# Altium PCB 24V-20A-Power-Board-v1.0.PcbDoc (part 4 of 4)
Units mil, origin at the board's own origin, x right, y up, seen from the top; angles counter-clockwise.
Board outline 6298 x 5166 mil, 4 copper layers (Top Layer, Layer-1, Layer-2, Bottom Layer), stack 61.653 mil thick; 190 components, 110 nets, 477 pads, 30 vias.
Unrouted connection lines stored in the file: 351.
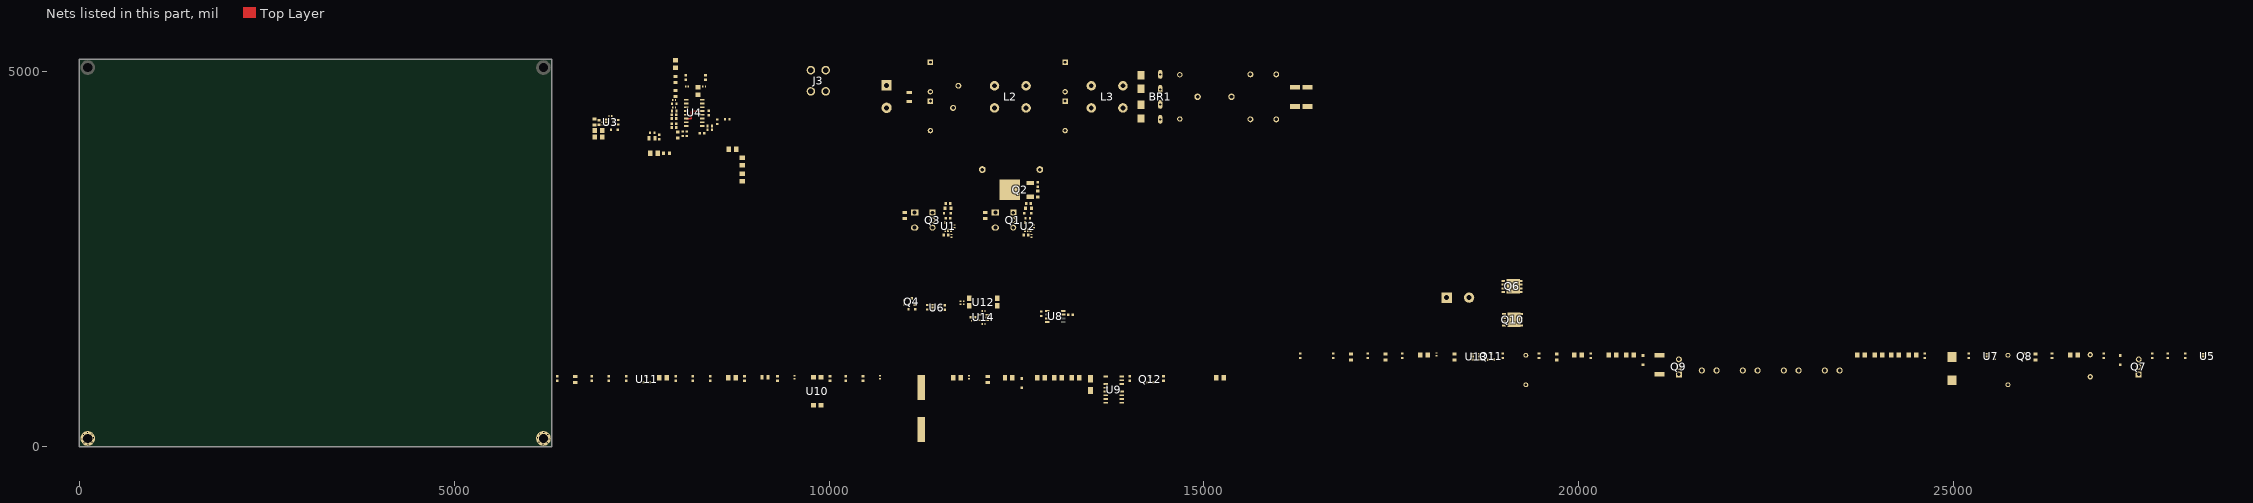
[diagram p2: the nets of this part, all layers, seen from the top]

## Part data (continued)
R40 R44 R75 R76: library part CRCW080510R0FKEAHP, "RES SMD 10 OHM 1% 1/2W 0805", Case Code (Imperial)=0805, Case Code (Metric)=2012, LCSC Part Number=C844598, Manufacturer=Vishay, Max Operating Temperature=155°C, Max Power Dissipation=333mW, Min Operating Temperature=-55°C, Package Quantity=5000, Power Rating=330mW, Ratings=AEC-Q200, Resistance Tolerance=1%, Resistor Type="Thick Film", Temperature Coefficient=100ppm/°C, Voltage Rating=150V, Case/Package=0805, ComponentLink1Description=http://www.farnell.com/datasheets/2884039.pdf?src-supplier=Newark, ComponentLink1URL=http://www.farnell.com/datasheets/2884039.pdf?src-supplier=Newark, ComponentLink2Description=https://datasheet.octopart.com/CRCW080510R0FKEAHP-Vishay-datasheet-87136057.pdf?src-supplier=Newark, ComponentLink2URL=https://datasheet.octopart.com/CRCW080510R0FKEAHP-Vishay-datasheet-87136057.pdf?src-supplier=Newark, ComponentLink3Description=http://www.vishay.com/docs/20043/crcwhpe3.pdf?src-supplier=Digikey, ComponentLink3URL=http://www.vishay.com/docs/20043/crcwhpe3.pdf?src-supplier=Digikey, Construction=Rectangular, Contact Plating=Tin, Depth=1.25mm, Features="Automotive AEC-Q200", Height=0.5mm, Item Type=Resistor, Lead Free="Lead Free", Length=2mm, Manufacturer Part Number=CRCW080510R0FKEAHP, Military Standard=Not, Number of Terminations=2, Packaging="Tape and Reel", Pricing="1=0.19, 10=0.066, 50=0.066, 100=0.04, 1000=0.027, 10000=0.023 (USD)", Radiation Hardening=No, Reach SVHC Compliant=Unknown, RoHS=Yes, RoHS Compliant=Yes, Series=CRCW-HP, Stock=384044, Supplier=Mouser, Technology="THICK FILM", Termination=SMD/SMT, Tolerance=1%, Voltage Rating (DC)=150V, Weight=0.000194oz, Width=1.2mm
R41 R45: library part RC0603FR-0722RL, "RES 22 OHM 1% 1/10W 0603", Case Code (Imperial)=0603, Case Code (Metric)=1608, LCSC Part Number=C107701, Manufacturer=Yageo, Max Operating Temperature=155°C, Max Power Dissipation=100mW, Min Operating Temperature=-55°C, Package Quantity=1, Resistance Tolerance=1%, Resistor Type="Thick Film", Temperature Coefficient=100ppm/°C, Voltage Rating=50V, Case/Package=0603, Category="Chip SMD Resistors", ComponentLink1Description=https://datasheet.ciiva.com/11819/0900766b80f96399-11819285.pdf?src-supplier=RSComponents, ComponentLink1URL=https://datasheet.ciiva.com/11819/0900766b80f96399-11819285.pdf?src-supplier=RSComponents, ComponentLink2Description=https://datasheet.ciiva.com/46395/443971-46395032.pdf?src-supplier=Element14, ComponentLink2URL=https://datasheet.ciiva.com/46395/443971-46395032.pdf?src-supplier=Element14, ComponentLink3Description=https://datasheet.ciiva.com/46440/1868787-46440901.pdf?src-supplier=Element14, ComponentLink3URL=https://datasheet.ciiva.com/46440/1868787-46440901.pdf?src-supplier=Element14, ComponentLink4Description=https://datasheet.ciiva.com/2454/pyu-r-int-thick-7-2454355.pdf?src-supplier=Digi-Key, ComponentLink4URL=https://datasheet.ciiva.com/2454/pyu-r-int-thick-7-2454355.pdf?src-supplier=Digi-Key, ComponentLink5Description=https://datasheet.ciiva.com/2454/pyu-r-int-thick-7-2454356.pdf?src-supplier=Digi-Key, ComponentLink5URL=https://datasheet.ciiva.com/2454/pyu-r-int-thick-7-2454356.pdf?src-supplier=Digi-Key, ComponentLink6Description=https://datasheet.ciiva.com/2454/pyu-r-int-thick-7-2454354.pdf?src-supplier=Digi-Key, ComponentLink6URL=https://datasheet.ciiva.com/2454/pyu-r-int-thick-7-2454354.pdf?src-supplier=Digi-Key, Construction=Rectangular, Depth=0.8mm, Features="Moisture Resistant", Height=0.022inch, Item Type=Resistor, Lead Free="Lead Free", Length=0.063inch, Manufacturer Part Number=RC0603FR-0722RL, Military Standard=Not, Number of Pins=2, Number of Terminations=2, Packaging="Tape and Reel", Power Rating=100mW, Pricing 1="5000=0.00133, 10000=0.00131, 20000=0.00127 (USD)", Reach SVHC Compliant=Yes, Resistance=22R, RoHS=Yes, RoHS Compliant=Yes, Series=RC, Size Code=0603, Stock 1=190000, Supplier 1=Avnet, Supplier Part Number 1=RC0603FR-0722RL, Technology="THICK FILM", Termination=SMD/SMT, Tolerance=1%, Voltage Rating (DC)=50V, Width=0.031inch
R42 R47: library part RC0603FR-074K7L, "RES SMD 4.7K OHM 1% 1/10W 0603", LCSC Part Number=C99782, Manufacturer=Yageo, Package=0603, ComponentLink7Description=LCSC, ComponentLink7URL=https://www.lcsc.com/product-detail/Chip-Resistor-Surface-Mount_YAGEO-RC0603FR-074K7L_C99782.html, Item Type=Resistor, Manufacturer Part Number=RC0603FR-074K7L
R43: library part PA2512FKF7T0U5E, "METAL CURRENT SENSOR 2512 1% 100", Case/Package=348Case, Manufacturer=Yageo, Max Operating Temperature=170°C, Min Operating Temperature=-55°C, Power Rating=3W, Temperature Coefficient=100ppm/°C, Tolerance=1%, ComponentLink1Description=https://www.yageo.com/upload/media/product/productsearch/datasheet/rchip/PYu-PA_E_51_RoHS_10.pdf?src-supplier=Digikey, ComponentLink1URL=https://www.yageo.com/upload/media/product/productsearch/datasheet/rchip/PYu-PA_E_51_RoHS_10.pdf?src-supplier=Digikey, ComponentLink2Description=https://datasheet.octopart.com/PA2512FKF7T0U5E-Yageo-datasheet-137700559.pdf?src-supplier=Future+Electronics, ComponentLink2URL=https://datasheet.octopart.com/PA2512FKF7T0U5E-Yageo-datasheet-137700559.pdf?src-supplier=Future+Electronics, Height=880um, Item Type=Resistors, LCSC Part Number=PA2512FKF7T0U5E, Manufacturer Part Number=PA2512FKF7T0U5E, Pricing="4000=0.23986 (USD)", RoHS=Yes, Stock=12000, Supplier=Avnet
R46: library part RT0603BRD0759K7L, "RES SMD 59.7KOHM 0.1% 1/10W 0603", Case/Package=0603, LCSC Part Number=C861481, Manufacturer=Yageo, Max Operating Temperature=155°C, Max Power Dissipation=100mW, Min Operating Temperature=-55°C, Temperature Coefficient=25ppm/°C, Tolerance=0.1%, ComponentLink1Description=http://www.yageo.com/documents/recent/PYu-RT_1-to-0.01_RoHS_L_8.pdf?src-supplier=Digikey, ComponentLink1URL=http://www.yageo.com/documents/recent/PYu-RT_1-to-0.01_RoHS_L_8.pdf?src-supplier=Digikey, Features="Moisture Resistant", Height=0.022inch, Item Type=Resistors, Length=0.063inch, Manufacturer Part Number=RT0603BRD0759K7L, Number of Terminations=2, Packaging="Tape and Reel", Pricing="1=0.14, 10=0.104, 50=0.083, 100=0.074, 1000=0.05, 10000=0.032 (USD)", RoHS=Yes, RoHS Compliant=Yes, Series=RT, Stock=8235, Supplier=Mouser, Width=0.031inch
R48: library part RC0805FR-07200RL, "RES 200 OHM 1% 1/8W 0805", Case Code (Imperial)=0805, Case Code (Metric)=2012, LCSC Part Number=C114567, Manufacturer=Yageo, Max Operating Temperature=155°C, Max Power Dissipation=125mW, Min Operating Temperature=-55°C, Supplier Part Number=6109607, Temperature Coefficient=100ppm/°C, Tolerance=1%, Voltage Rating=150V, Case/Package=0805, Category="Chip SMD Resistors", ComponentLink1Description=https://datasheet.ciiva.com/12667/rc0805-12667066.pdf?src-supplier=Mouser, ComponentLink1URL=https://datasheet.ciiva.com/12667/rc0805-12667066.pdf?src-supplier=Mouser, ComponentLink2Description=https://datasheet.ciiva.com/2519/pyu-r-int-thick-7-2519721.pdf?src-supplier=Digi-Key, ComponentLink2URL=https://datasheet.ciiva.com/2519/pyu-r-int-thick-7-2519721.pdf?src-supplier=Digi-Key, ComponentLink3Description=https://datasheet.ciiva.com/2519/pyu-r-int-thick-7-2519722.pdf?src-supplier=Digi-Key, ComponentLink3URL=https://datasheet.ciiva.com/2519/pyu-r-int-thick-7-2519722.pdf?src-supplier=Digi-Key, ComponentLink4Description=https://datasheet.ciiva.com/2519/pyu-r-int-thick-7-2519720.pdf?src-supplier=Digi-Key, ComponentLink4URL=https://datasheet.ciiva.com/2519/pyu-r-int-thick-7-2519720.pdf?src-supplier=Digi-Key, ComponentLink5Description=https://datasheet.ciiva.com/15189/getdatasheetpartid-327982-15189926.pdf?src-supplier=Verical, ComponentLink5URL=https://datasheet.ciiva.com/15189/getdatasheetpartid-327982-15189926.pdf?src-supplier=Verical, Construction=Rectangular, Depth=1.25mm, Features="Moisture Resistant", Item Type=Resistor, Lead Free="Lead Free", Length=2mm, Manufacturer Part Number=RC0805FR-07200RL, Military Standard=Not, Mounting Technology="Surface Mount", Number of Terminations=2, Packaging="Tape and Reel", Power Rating=125mW, Pricing="5000=0.0026, 25000=0.0024, 125000=0.0023, 500000=0.0022, 1250000=0.002 (USD)", RoHS=Yes, RoHS Compliant=Yes, Series=RC, Stock=1070000, Supplier="Future Electronics", Termination=SMD/SMT, Voltage Rating (DC)=150V
R51 R65: library part RC0603FR-07113KL, "RES 113K OHM 1% 1/10W 0603", Case Code (Imperial)=0603, Case Code (Metric)=1608, Manufacturer=Yageo, Max Operating Temperature=155°C, Max Power Dissipation=100mW, Min Operating Temperature=-55°C, Supplier Part Number=311-113KHRCT-ND, Temperature Coefficient=100ppm/°C, Tolerance=1%, Voltage Rating=50V, Case/Package=0603, Category="Chip SMD Resistors", ComponentLink1Description=http://www.mouser.com/catalog/specsheets/RC0603.pdf?src-supplier=Mouser, ComponentLink1URL=http://www.mouser.com/catalog/specsheets/RC0603.pdf?src-supplier=Mouser, ComponentLink2Description=http://www.yageo.com/pdf/PYu-RC0603_51_RoHS_L_4.pdf?src-supplier=Avnet, ComponentLink2URL=http://www.yageo.com/pdf/PYu-RC0603_51_RoHS_L_4.pdf?src-supplier=Avnet, ComponentLink3Description=http://www.yageo.com/documents/recent/PYu-RC_Group_51_RoHS_L_9.pdf?src-supplier=Digikey, ComponentLink3URL=http://www.yageo.com/documents/recent/PYu-RC_Group_51_RoHS_L_9.pdf?src-supplier=Digikey, ComponentLink4Description=http://www.yageo.com/documents/recent/PYu-RC_Group_51_RoHS_L_10.pdf?src-supplier=Digikey, ComponentLink4URL=http://www.yageo.com/documents/recent/PYu-RC_Group_51_RoHS_L_10.pdf?src-supplier=Digikey, ComponentLink5Description=https://datasheet.octopart.com/RC0603FR-07113KL-Yageo-datasheet-118562.pdf?src-supplier=Digikey, ComponentLink5URL=https://datasheet.octopart.com/RC0603FR-07113KL-Yageo-datasheet-118562.pdf?src-supplier=Digikey, ComponentLink6Description=http://www.yageo.com/documents/recent/PYu-RC0603_51_RoHS_L_7.pdf?src-supplier=Future+Electronics, ComponentLink6URL=http://www.yageo.com/documents/recent/PYu-RC0603_51_RoHS_L_7.pdf?src-supplier=Future+Electronics, ComponentLink7Description=https://datasheet.octopart.com/RC0603FR-07113KL-Yageo-datasheet-164759695.pdf?src-supplier=Future+Electronics, ComponentLink7URL=https://datasheet.octopart.com/RC0603FR-07113KL-Yageo-datasheet-164759695.pdf?src-supplier=Future+Electronics, Contact Plating=Tin,Lead, Features="Moisture Resistant", Height=0.45mm, Lead Free="Lead Free", Length=1.6mm, Manufacturer Part Number=RC0603FR-07113KL, Number of Terminations=2, Packaging="Tape and Reel", Power Rating=100mW, Pricing="1=0.1, 10=0.019, 50=0.0112, 100=0.0093, 500=0.00622, 1000=0.00532 (USD)", RoHS=Yes, RoHS Compliant=Resistor, Series=RC, Stock=1058641, Supplier=Digikey, Termination=SMD/SMT, Voltage Rating (DC)=50V, Width=0.8mm
R52 R53 R54: library part RC1206FR-7W1KL, "RES 1K OHM 1% 1/2W 1206", LCSC Part Number=C859155, Manufacturer=Yageo, Supplier Part Number 1=13-RC1206FR-7W1KLCT-ND, Category="Chip SMD Resistors", ComponentLink1Description=LCSC, ComponentLink1URL=https://www.lcsc.com/product-detail/Chip-Resistor-Surface-Mount_YAGEO-RC1206FR-7W1KL_C859155.html, Item Type=Resistor, Manufacturer Part Number=RC1206FR-7W1KL, Pricing 1="1=0.19000, 10=0.15700, 100=0.06150, 1000=0.02572, 2500=0.02358 (USD)", RoHS=Yes, RoHS Compliant=Yes, Stock 1=6215, Supplier 1=Digi-Key
R55 R58 R63: library part RNCF1206DTE374K, "RES SMD 374K OHM 0.5% 1/4W 1206", Case Code (Imperial)=1206, Case Code (Metric)=3216, LCSC Part Number=C346652, Manufacturer="Stackpole Electronics", Max Operating Temperature=155°C, Max Power Dissipation=250mW, Min Operating Temperature=-55°C, Temperature Coefficient=25ppm/°C, Tolerance=0.5%, Case/Package=1206, ComponentLink1Description=https://www.seielect.com/Catalog/SEI-RNCF.pdf?src-supplier=Digikey, ComponentLink1URL=https://www.seielect.com/Catalog/SEI-RNCF.pdf?src-supplier=Digikey, Features="Moisture Resistant", Height=0.026inch, Item Type=Resistors, Length=0.126inch, Manufacturer Part Number=RNCF1206DTE374K, Mounting Technology="Surface Mount", Number of Terminations=2, Packaging="Cut Tape", Pricing="5000=0.03682 (USD)", RoHS=Yes, RoHS Compliant=Yes, Series=RNCF, Supplier=Digikey, Width=0.063inch
R57 R60 R71 R72: library part RC0402FR-076K04L, "RES 6.04K OHM 1% 1/16W 0402", Case Code (Imperial)=0402, Case Code (Metric)=1005, LCSC Part Number=C97819, Manufacturer=Yageo, Max Operating Temperature=155°C, Max Power Dissipation=63mW, Min Operating Temperature=-55°C, Package Quantity=10000, Power Rating=62.5mW, Resistance=6.04kR, Resistor Type="Thick Film", Supplier Part Number 1=603-RC0402FR-076K04L, Temperature Coefficient=100ppm/°C, Tolerance=1%, Voltage Rating=50V, Case/Package=0402, Category="Chip SMD Resistors", ComponentLink1Description=https://datasheet.ciiva.com/5558/pyu-rc0402-51-rohs-l-6-r-5558087.pdf?src-supplier=Mouser, ComponentLink1URL=https://datasheet.ciiva.com/5558/pyu-rc0402-51-rohs-l-6-r-5558087.pdf?src-supplier=Mouser, ComponentLink2Description=https://datasheet.ciiva.com/8892/pyu-rc0402-51-rohs-l-6-8892414.pdf?src-supplier=Avnet, ComponentLink2URL=https://datasheet.ciiva.com/8892/pyu-rc0402-51-rohs-l-6-8892414.pdf?src-supplier=Avnet, ComponentLink3Description=https://datasheet.ciiva.com/2552/pyu-r-int-thick-7-2552970.pdf?src-supplier=Digi-Key, ComponentLink3URL=https://datasheet.ciiva.com/2552/pyu-r-int-thick-7-2552970.pdf?src-supplier=Digi-Key, Construction=Rectangular, Contact Plating=Tin,Matte, Depth=0.5mm, Features="Moisture Resistant", Height=0.016inch, Lead Free="Lead Free", Length=1mm, Manufacturer Part Number=RC0402FR-076K04L, Military Standard=Not, Number of Terminations=2, Packaging="Tape and Reel", Pricing 1="1=0.10000, 10=0.01200, 50=0.01200, 100=0.00500, 1000=0.00300, 2500=0.00200, 10000=0.00100 (USD)", RoHS=Yes, RoHS Compliant=Yes, Series=RC, Stock 1=365311, Supplier 1=Mouser, Technology="THICK FILM", Termination=SMD/SMT, Voltage Rating (DC)=50V, Width=0.02inch, Working Voltage=50V
R59: library part 0603WAF7503T5E, "100mW Thick Film Resistors 75V ±100ppm/℃ ±1% 750kΩ 0603 Chip Resistor - Surface Mount ROHS", LCSC Part Number=C23240, Manufacturer=UNI-ROYAL, Package=0603, ComponentLink1Description=LCSC, ComponentLink1URL=https://www.lcsc.com/product-detail/Chip-Resistor-Surface-Mount_UNI-ROYAL-Uniroyal-Elec-0603WAF7503T5E_C23240.html, Item Type=Resistor, Manufacturer Part Number=0603WAF7503T5E
R61: library part RT0603DRD07147KL, "RES SMD 147K OHM 0.5% 1/10W 0603", Case Code (Imperial)=0603, Case Code (Metric)=1608, LCSC Part Number=C728612, Manufacturer=Yageo, Max Operating Temperature=155°C, Max Power Dissipation=100mW, Min Operating Temperature=-55°C, Package Quantity=10, Supplier Part Number 1=603-RT0603DRD07147KL, Temperature Coefficient=25ppm/°C, Tolerance=0.5%, Voltage Rating (DC)=50V, Case/Package=0603, Category="Chip SMD Resistors", ComponentLink1Description=http://www.yageo.com/documents/recent/PYu-RT_1-to-0.01_RoHS_L_9.pdf?src-supplier=Digi-Key, ComponentLink1URL=http://www.yageo.com/documents/recent/PYu-RT_1-to-0.01_RoHS_L_9.pdf?src-supplier=Digi-Key, Height=0.45mm, Item Type=Resistor, Lead Free="Lead Free", Length=1.6mm, Manufacturer Part Number=RT0603DRD07147KL, Number of Terminations=2, Packaging="Tape and Reel", Power Rating=100mW, Pricing 1="1=0.18000, 10=0.14700, 50=0.14700, 100=0.05600, 1000=0.02400, 10000=0.01800 (USD)", RoHS=Yes, RoHS Compliant=Yes, Series=RT, Stock 1=1848, Supplier 1=Mouser, Width=0.8mm
R64: library part RC0603DR-07487KL, "RES 487K OHM 0.5% 1/10W 0603", Case/Package=0603, LCSC Part Number=C859043, Manufacturer=Yageo, Max Operating Temperature=155°C, Max Power Dissipation=100mW, Min Operating Temperature=-55°C, Temperature Coefficient=100ppm/°C, Tolerance=0.5%, ComponentLink1Description=http://www.yageo.com.tw/exep/pages/download/literatures/PYu-R_INT-thick_7.pdf?src-supplier=Digikey, ComponentLink1URL=http://www.yageo.com.tw/exep/pages/download/literatures/PYu-R_INT-thick_7.pdf?src-supplier=Digikey, Features="Moisture Resistant", Height=0.022inch, Item Type=Resistors, Length=0.063inch, Manufacturer Part Number=RC0603DR-07487KL, Number of Terminations=2, Packaging="Tape and Reel", Pricing="5000=0.00887 (USD)", RoHS=Yes, RoHS Compliant=Yes, Series=RC, Supplier=Digikey, Width=0.031inch
R69: library part 0603WAF1692T5E, "100mW Thick Film Resistors 75V ±100ppm/℃ ±1% 16.9kΩ 0603 Chip Resistor - Surface Mount ROHS", LCSC Part Number=C25954, Manufacturer=UNI-ROYAL, Package=0603, ComponentLink1Description=LCSC, ComponentLink1URL=https://www.lcsc.com/product-detail/Chip-Resistor-Surface-Mount_UNI-ROYAL-Uniroyal-Elec-0603WAF1692T5E_C25954.html, Item Type=Resistor, Manufacturer Part Number=0603WAF1692T5E
R70 R74: library part RC0402FR-071ML, "RES 1M OHM 1% 1/16W 0402", Case Code (Imperial)=0402, Case Code (Metric)=1005, LCSC Part Number=C138033, Manufacturer=Yageo, Max Operating Temperature=155°C, Max Power Dissipation=63mW, Min Operating Temperature=-55°C, Resistance Tolerance=1%, Resistor Type="Thick Film", Supplier Part Number=311-1.00MLRCT-ND, Temperature Coefficient=100ppm/°C, Voltage Rating=50V, Case/Package=0402, Category="Chip SMD Resistors", ComponentLink1Description=https://datasheet.ciiva.com/11808/0900766b80c66297-11808125.pdf?src-supplier=Rs, ComponentLink1URL=https://datasheet.ciiva.com/11808/0900766b80c66297-11808125.pdf?src-supplier=Rs, ComponentLink2Description=https://datasheet.ciiva.com/46394/1018594-46394951.pdf?src-supplier=Element14, ComponentLink2URL=https://datasheet.ciiva.com/46394/1018594-46394951.pdf?src-supplier=Element14, ComponentLink3Description=https://datasheet.ciiva.com/7849/1018594-7849883.pdf?src-supplier=Element14, ComponentLink3URL=https://datasheet.ciiva.com/7849/1018594-7849883.pdf?src-supplier=Element14, ComponentLink4Description=https://datasheet.ciiva.com/7849/1018594-7849882.pdf?src-supplier=Element14, ComponentLink4URL=https://datasheet.ciiva.com/7849/1018594-7849882.pdf?src-supplier=Element14, ComponentLink5Description=https://datasheet.ciiva.com/16741/pyu-rc0402-51-rohs-l-6-r-16741081.pdf?src-supplier=Future+Electronics, ComponentLink5URL=https://datasheet.ciiva.com/16741/pyu-rc0402-51-rohs-l-6-r-16741081.pdf?src-supplier=Future+Electronics, Construction=Rectangular, Depth=0.5mm, Features="Moisture Resistant", Height=0.32mm, Item Type=Resistor, Lead Free=5697LeadFree, Length=1mm, Manufacturer Part Number=RC0402FR-071ML, Military Standard=Not, Number of Terminations=2, Packaging="Tape and Reel", Power Rating=63mW, Pricing="1=0.1, 10=0.015, 50=0.0088, 100=0.0073, 500=0.00488, 1000=0.00417, 5000=0.00297 (USD)", Reach SVHC Compliant=Unknown, RoHS=Yes, RoHS Compliant=Yes, Series=RC, Stock=6516, Supplier=Digikey, Technology="THICK FILM", Termination=SMD/SMT, Tolerance=1%, Voltage Rating (AC)=50V
R73: library part CRCW0402330KFKEDC, "RES 330K OHM 1% 1/16W 0402", Case/Package=0402, LCSC Part Number=C3009051, Manufacturer=Vishay, Power Rating=63mW, Supplier Part Number=71-CRCW0402330KFKEDC, Tolerance=1%, Category="Chip SMD Resistors", Item Type=Resistor, Lead Free="Lead Free", Manufacturer Part Number=CRCW0402330KFKEDC, Pricing="1=0.1, 10=0.017, 50=0.017, 100=0.008, 1000=0.005, 10000=0.004 (USD)", RoHS=Yes, RoHS Compliant=Yes, Stock=34154, Supplier=Mouser
R78: library part "1/4 watt Resistor", "Wirewound Resistors 47Ω 2W ±350ppm/℃ ±5% Plugin,D5xL15.5mm Through Hole Resistors ROHS", LCSC Part Number=C122138, Manufacturer="CCO(Chian Chia Elec)", Item Type=Resistor, Manufacturer Part Number="KNP2W-47Ω±5% T"
R79: library part 0603WAF1104T5E, "100mW Thick Film Resistors 75V ±100ppm/℃ ±1% 1.1MΩ 0603 Chip Resistor - Surface Mount ROHS", LCSC Part Number=C13314, Manufacturer=Uniroyal, Item Type=Resistor, Manufacturer Part Number=0603WAF1104T5E, RoHS=No, Supplier=LCSC
U1 U2: "IC GATE DRVR LOW-SIDE SOT23-5", Case/Package=SOT-23-5, LCSC Part Number=C99395, Manufacturer="Texas Instruments", Max Operating Temperature=140°C, Max Output current=4A, Max Supply Voltage=18V, Min Operating Temperature=-40°C, Min Supply Voltage=4.5V, Operating Supply Voltage=12V, Package Quantity=3000, Channel Type=Single, ComponentLink1Description=http://components.arrow.com/part/dataview/52526194S5756N7713?src-supplier=Arrow+Electronics, ComponentLink1URL=http://components.arrow.com/part/dataview/52526194S5756N7713?src-supplier=Arrow+Electronics, ComponentLink2Description=http://www.ti.com/lit/ds/symlink/ucc27517.pdf?src-supplier=Avnet, ComponentLink2URL=http://www.ti.com/lit/ds/symlink/ucc27517.pdf?src-supplier=Avnet, ComponentLink3Description=http://www.ti.com/lit/ds/symlink/ucc27517.pdf?src-supplier=Digikey, ComponentLink3URL=http://www.ti.com/lit/ds/symlink/ucc27517.pdf?src-supplier=Digikey, ComponentLink4Description=http://www.ti.com/lit/gpn/ucc27517?src-supplier=Mouser, ComponentLink4URL=http://www.ti.com/lit/gpn/ucc27517?src-supplier=Mouser, ComponentLink5Description=http://www.ti.com/general/docs/lit/getliterature.tsp?genericPartNumber=UCC27516&&fileType=pdf&src-supplier=Avnet, ComponentLink5URL=http://www.ti.com/general/docs/lit/getliterature.tsp?genericPartNumber=UCC27516&&fileType=pdf&src-supplier=Avnet, ComponentLink6Description=https://www.verical.com/server-webapp/html/getDatasheet?partID=482756&src-supplier=Verical, ComponentLink6URL=https://www.verical.com/server-webapp/html/getDatasheet?partID=482756&src-supplier=Verical, Fall Time=11ns, Height=1.45mm, Item Type=IC, Lead Free="Lead Free", Length=2.9mm, Manufacturer Part Number=UCC27517DBVR, Mounting Technology="Surface Mount", Number of Channels=1, Number of Drivers=1, Number of Outputs=1, Output Current=4A, Packaging="Tape and Reel", Pins=5, Pricing="1=0.77, 10=0.646, 50=0.646, 100=0.501, 1000=0.346, 10000=0.29 (USD)", Propagation Delay=30ns, Radiation Hardening=No, Rise Time=22ns, RoHS=Yes, RoHS Compliant=Yes, Series=-, Stock=71094, Supplier=Mouser, Thickness=1.2mm, Turn-On Delay Time=30ns, Width=1.6mm
U3: "IC OPAMP GP 1 CIRCUIT SOT23-5", LCSC Part Number=C2864299, Manufacturer="Texas Instruments", ComponentLink1Description=http://www.ti.com/lit/ds/symlink/tlv171.pdf?src-supplier=Digikey, ComponentLink1URL=http://www.ti.com/lit/ds/symlink/tlv171.pdf?src-supplier=Digikey, ComponentLink2Description=http://www.ti.com/general/docs/suppproductinfo.tsp?distId=10&amp;gotoUrl=http%3A%2F%2Fwww.ti.com%2Flit%2Fgpn%2Ftlv171&src-supplier=Digikey, ComponentLink2URL=http://www.ti.com/general/docs/suppproductinfo.tsp?distId=10&amp;gotoUrl=http%3A%2F%2Fwww.ti.com%2Flit%2Fgpn%2Ftlv171&src-supplier=Digikey, Item Type=IC, Manufacturer Part Number=TLV171IDBVR, Pricing="1=1.26, 10=1.09, 50=1.09, 100=0.829, 1000=0.578, 10000=0.478 (USD)", RoHS=Yes, Stock=79952, Supplier=Mouser
U4: "IC PFC CTR TRANS 45KHZ 16SOIC", LCSC Part Number=C882391, Manufacturer="Texas Instruments", ComponentLink1Description=http://www.ti.com/general/docs/suppproductinfo.tsp?distId=10&amp;gotoUrl=http%3A%2F%2Fwww.ti.com%2Flit%2Fgpn%2Fucc28064a&src-supplier=Digikey, ComponentLink1URL=http://www.ti.com/general/docs/suppproductinfo.tsp?distId=10&amp;gotoUrl=http%3A%2F%2Fwww.ti.com%2Flit%2Fgpn%2Fucc28064a&src-supplier=Digikey, Item Type=IC, Manufacturer Part Number=UCC28064ADR, Pricing="1=2.39, 10=2.15, 50=2.15, 100=1.73, 1000=1.17, 10000=1 (USD)", RoHS=Yes, Stock=4170, Supplier=Mouser
U5 U7: "SYNC RECTIFIER FLYBACK", LCSC Part Number=C2657796, Manufacturer="Texas Instruments", ComponentLink1Description=http://www.ti.com/general/docs/suppproductinfo.tsp?distId=10&amp;gotoUrl=http%3A%2F%2Fwww.ti.com%2Flit%2Fgpn%2Fucc24612&src-supplier=Digikey, ComponentLink1URL=http://www.ti.com/general/docs/suppproductinfo.tsp?distId=10&amp;gotoUrl=http%3A%2F%2Fwww.ti.com%2Flit%2Fgpn%2Fucc24612&src-supplier=Digikey, Item Type=IC, Manufacturer Part Number=UCC24612-1DBVR, Pricing="1=0.92, 10=0.757, 50=0.757, 100=0.574, 1000=0.391, 10000=0.302 (USD)", RoHS=Yes, Stock=14678, Supplier=Mouser
U6: "IC REG LINEAR 5V 100MA SOT23-5", LCSC Part Number=C2877856, Manufacturer="Texas Instruments", ComponentLink1Description=https://datasheet.ciiva.com/2042/lp2981a-50-2042256.pdf?src-supplier=Digikey, ComponentLink1URL=https://datasheet.ciiva.com/2042/lp2981a-50-2042256.pdf?src-supplier=Digikey, ComponentLink2Description=https://datasheet.ciiva.com/41458/001014295-da-01-en-ic-reg-ldo-5v-0-lp2981-50dbvr-sot-5-tid-41458697.pdf?src-supplier=Conrad, ComponentLink2URL=https://datasheet.ciiva.com/41458/001014295-da-01-en-ic-reg-ldo-5v-0-lp2981-50dbvr-sot-5-tid-41458697.pdf?src-supplier=Conrad, ComponentLink3Description=https://datasheet.ciiva.com/3223/lp2981a-33-3223861.pdf?src-supplier=Avnet, ComponentLink3URL=https://datasheet.ciiva.com/3223/lp2981a-33-3223861.pdf?src-supplier=Avnet, ComponentLink4Description=https://datasheet.ciiva.com/2042/lp2981a-50-2042254.pdf?src-supplier=Digikey, ComponentLink4URL=https://datasheet.ciiva.com/2042/lp2981a-50-2042254.pdf?src-supplier=Digikey, ComponentLink5Description=https://datasheet.ciiva.com/2042/lp2981a-50-2042255.pdf?src-supplier=Digikey, ComponentLink5URL=https://datasheet.ciiva.com/2042/lp2981a-50-2042255.pdf?src-supplier=Digikey, Item Type=IC, Manufacturer Part Number=LP2981-50DBVR, Pricing="1=0.34, 10=0.274, 50=0.274, 100=0.203, 1000=0.138, 10000=0.137 (USD)", RoHS=Yes, Stock=14435, Supplier=Mouser
U8: "IC REG LIN POS ADJ 100MA 8SOIC", LCSC Part Number=C67596, Manufacturer="TI National Semiconductor", Max Supply Voltage=30V, Min Supply Voltage=2.3V, Nominal Supply Current=75uA, ComponentLink1Description=https://datasheet.ciiva.com/27052/1323645-27052000.pdf?src-supplier=Jameco, ComponentLink1URL=https://datasheet.ciiva.com/27052/1323645-27052000.pdf?src-supplier=Jameco, ComponentLink2Description=https://datasheet.ciiva.com/41458/001014279-da-01-en-ic-reg-ldo-ad-lp2951acmx-nopb-soic-8-tid-41458660.pdf?src-supplier=Conrad, ComponentLink2URL=https://datasheet.ciiva.com/41458/001014279-da-01-en-ic-reg-ldo-ad-lp2951acmx-nopb-soic-8-tid-41458660.pdf?src-supplier=Conrad, ComponentLink3Description=https://datasheet.ciiva.com/3223/lp2950-n-3223829.pdf?src-supplier=Avnet, ComponentLink3URL=https://datasheet.ciiva.com/3223/lp2950-n-3223829.pdf?src-supplier=Avnet, ComponentLink4Description=https://datasheet.ciiva.com/3223/lp2950-n-3223830.pdf?src-supplier=Avnet, ComponentLink4URL=https://datasheet.ciiva.com/3223/lp2950-n-3223830.pdf?src-supplier=Avnet, ComponentLink5Description=https://datasheet.ciiva.com/4886/lp2950-n-4886917.pdf?src-supplier=Mouser, ComponentLink5URL=https://datasheet.ciiva.com/4886/lp2950-n-4886917.pdf?src-supplier=Mouser, ComponentLink6Description=https://datasheet.ciiva.com/6597/lp2950-n-6597112.pdf?src-supplier=Digikey, ComponentLink6URL=https://datasheet.ciiva.com/6597/lp2950-n-6597112.pdf?src-supplier=Digikey, ComponentLink7Description=https://datasheet.ciiva.com/6597/lp2950-n-6597113.pdf?src-supplier=Digikey, ComponentLink7URL=https://datasheet.ciiva.com/6597/lp2950-n-6597113.pdf?src-supplier=Digikey, ComponentLink8Description=https://datasheet.ciiva.com/6597/lp2950-n-6597114.pdf?src-supplier=Digikey, ComponentLink8URL=https://datasheet.ciiva.com/6597/lp2950-n-6597114.pdf?src-supplier=Digikey, Height=1.75mm, Item Type=IC, Length=4.9mm, Manufacturer Part Number=LP2951ACMX/NOPB, Pricing="1=0.89, 10=0.732, 50=0.732, 100=0.542, 1000=0.369, 10000=0.308 (USD)", Quiescent Current=75uA, RoHS=Yes, Stock=19390, Supplier=Mouser, Thickness=1.58mm, Width=3.91mm
U9: "Half-Bridge Regulator Positive, Isolation Capable Output DC-DC Controller IC 14-SOIC", Case/Package=SOIC, Manufacturer="Texas Instruments", Max Operating Temperature=125°C, Min Operating Temperature=-40°C, Supplier Part Number=595-UCC25630-1DDBR, Switching Frequency=1MHz, Clock Sync=No, ComponentLink1Description=http://www.ti.com/lit/sg/slyt728/slyt728.pdf?src-supplier=Digikey, ComponentLink1URL=http://www.ti.com/lit/sg/slyt728/slyt728.pdf?src-supplier=Digikey, ComponentLink2Description=http://www.ti.com/general/docs/suppproductinfo.tsp?distId=10&amp;gotoUrl=http%3A%2F%2Fwww.ti.com%2Flit%2Fgpn%2Fucc256301&src-supplier=Digikey, ComponentLink2URL=http://www.ti.com/general/docs/suppproductinfo.tsp?distId=10&amp;gotoUrl=http%3A%2F%2Fwww.ti.com%2Flit%2Fgpn%2Fucc256301&src-supplier=Digikey, Item Type=IC, Manufacturer Part Number=UCC25630-1DDBR, Max Duty Cycle=50%, Number of Output Phases=1, Number of Outputs=1, Packaging="Cut Tape", Pricing="1=3.78, 10=3.22, 50=3.22, 100=2.79, 1000=2, 10000=1.89 (USD)", RoHS=Yes, RoHS Compliant=Yes, Series=-, Stock=2241, Supplier=Mouser, Synchronous Rectifier=No
U10 U12: "OPTOISOLATOR 5.3KV TRANS 4-SMD", LCSC Part Number=C143748, Manufacturer="Vishay Semiconductors", ComponentLink1Description=https://datasheet.ciiva.com/2087/vo618a-2087431.pdf?src-supplier=Digikey, ComponentLink1URL=https://datasheet.ciiva.com/2087/vo618a-2087431.pdf?src-supplier=Digikey, ComponentLink2Description=https://datasheet.ciiva.com/2087/vo618a-2087432.pdf?src-supplier=Digikey, ComponentLink2URL=https://datasheet.ciiva.com/2087/vo618a-2087432.pdf?src-supplier=Digikey, ComponentLink3Description=https://datasheet.ciiva.com/2087/vo618a-2087433.pdf?src-supplier=Digikey, ComponentLink3URL=https://datasheet.ciiva.com/2087/vo618a-2087433.pdf?src-supplier=Digikey, Item Type=IC, Manufacturer Part Number=VO618A-3X017T, Pricing="1=0.37, 10=0.242, 50=0.242, 100=0.16, 1000=0.136, 10000=0.106 (USD)", RoHS=Yes, Stock=90870, Supplier=Mouser
U11: "IC VREF SHUNT ADJ 1% SOT23-3", Case/Package=SOT-23, Cathode Current=600uA, LCSC Part Number=C350683, Manufacturer="Texas Instruments", Max Operating Temperature=125°C, Max Output current=100mA, Max Output Voltage=36V, Max Supply Voltage=37V, Min Input Voltage=2.495V, Min Operating Temperature=-40°C, Package Quantity=3000, Temperature Coefficient=34ppm/°C, Tolerance=1%, ComponentLink1Description=https://datasheet.ciiva.com/15149/getdatasheetpartid-184457-15149018.pdf?src-supplier=Verical, ComponentLink1URL=https://datasheet.ciiva.com/15149/getdatasheetpartid-184457-15149018.pdf?src-supplier=Verical, ComponentLink2Description=https://datasheet.ciiva.com/2006/tl431a-2006221.pdf?src-supplier=Digikey, ComponentLink2URL=https://datasheet.ciiva.com/2006/tl431a-2006221.pdf?src-supplier=Digikey, ComponentLink3Description=https://datasheet.ciiva.com/2006/tl431a-2006220.pdf?src-supplier=Digikey, ComponentLink3URL=https://datasheet.ciiva.com/2006/tl431a-2006220.pdf?src-supplier=Digikey, ComponentLink4Description=https://datasheet.ciiva.com/2006/tl431a-2006222.pdf?src-supplier=Digikey, ComponentLink4URL=https://datasheet.ciiva.com/2006/tl431a-2006222.pdf?src-supplier=Digikey, ComponentLink5Description=https://datasheet.ciiva.com/3235/tl432b-3235591.pdf?src-supplier=Avnet, ComponentLink5URL=https://datasheet.ciiva.com/3235/tl432b-3235591.pdf?src-supplier=Avnet, Item Type=IC, Lead Free="Lead Free", Manufacturer Part Number=TL431ACDBZR, Min Output Voltage=2.495V, Output Current=100mA, Output Type=Adjustable, Output Voltage=36V, Packaging="Tape and Reel", Pins=3, Pricing="1=0.42, 10=0.283, 50=0.283, 100=0.134, 1000=0.103, 10000=0.079 (USD)", Radiation Hardening=No, Reach SVHC Compliant=No, Reference Type=Shunt,Adjustable, Reference Voltage=36V, RoHS=Yes, RoHS Compliant=Yes, Series=-, Stock=33202, Supplier=Mouser, Termination=SMD/SMT, Thickness=1mm
U13: "IC CURR SENSE 1 CIRCUIT SOT23-6", Manufacturer="Texas Instruments", Supplier Part Number=595-INA181A4IDBVR, Category="Amplifiers - Op Amps, Buffer, Instrumentation", ComponentLink1Description=http://www.ti.com/lit/ds/symlink/ina181.pdf?src-supplier=Digikey, ComponentLink1URL=http://www.ti.com/lit/ds/symlink/ina181.pdf?src-supplier=Digikey, ComponentLink2Description=http://www.ti.com/general/docs/suppproductinfo.tsp?distId=10&amp;gotoUrl=http%3A%2F%2Fwww.ti.com%2Flit%2Fgpn%2Fina181&src-supplier=Digikey, ComponentLink2URL=http://www.ti.com/general/docs/suppproductinfo.tsp?distId=10&amp;gotoUrl=http%3A%2F%2Fwww.ti.com%2Flit%2Fgpn%2Fina181&src-supplier=Digikey, Manufacturer Part Number=INA181A4IDBVR, Pricing="1=0.49, 10=0.38, 50=0.38, 100=0.279, 1000=0.164, 10000=0.14 (USD)", RoHS=Yes, Stock=25817, Supplier=Mouser
U14: "IC COMPARATOR 1 DIFF SOT23-5", LCSC Part Number=C80942, Manufacturer="Texas Instruments", ComponentLink1Description=https://datasheet.ciiva.com/1483/1771402-1483765.pdf?src-supplier=Element14, ComponentLink1URL=https://datasheet.ciiva.com/1483/1771402-1483765.pdf?src-supplier=Element14, ComponentLink2Description=https://datasheet.ciiva.com/1827/tl331-1827297.pdf?src-supplier=Digikey, ComponentLink2URL=https://datasheet.ciiva.com/1827/tl331-1827297.pdf?src-supplier=Digikey, ComponentLink3Description=https://datasheet.ciiva.com/1827/tl331-1827298.pdf?src-supplier=Digikey, ComponentLink3URL=https://datasheet.ciiva.com/1827/tl331-1827298.pdf?src-supplier=Digikey, ComponentLink4Description=https://datasheet.ciiva.com/1827/tl331-1827299.pdf?src-supplier=Digikey, ComponentLink4URL=https://datasheet.ciiva.com/1827/tl331-1827299.pdf?src-supplier=Digikey, ComponentLink5Description=https://datasheet.ciiva.com/2970/tl331-2970638.pdf?src-supplier=Avnet, ComponentLink5URL=https://datasheet.ciiva.com/2970/tl331-2970638.pdf?src-supplier=Avnet, ComponentLink6Description=https://datasheet.ciiva.com/2970/tl331-2970639.pdf?src-supplier=Avnet, ComponentLink6URL=https://datasheet.ciiva.com/2970/tl331-2970639.pdf?src-supplier=Avnet, ComponentLink7Description=https://datasheet.ciiva.com/46384/1887693-46384373.pdf?src-supplier=Element14, ComponentLink7URL=https://datasheet.ciiva.com/46384/1887693-46384373.pdf?src-supplier=Element14, ComponentLink8Description=https://datasheet.ciiva.com/46384/1887693-46384376.pdf?src-supplier=Element14, ComponentLink8URL=https://datasheet.ciiva.com/46384/1887693-46384376.pdf?src-supplier=Element14, Item Type=IC, Manufacturer Part Number=TL331IDBVR, Pricing="1=0.5, 10=0.396, 50=0.396, 100=0.295, 1000=0.207, 10000=0.152 (USD)", RoHS=Yes, Stock=106032, Supplier=Mouser
VR1: "VARISTOR 430V 3.5KA DISC 10MM", Case/Package=Radial, Clamping Current=25A, Clamping Voltage=710V, Flammability Rating=5813Flammability, LCSC Part Number=C210564, Manufacturer="TDK EPCOS", Max Operating Temperature=85°C, Max Surge Current=3.5kA, Max Varistor Voltage=473V, Max Voltage Rating (AC)=275V, Max Voltage Rating (DC)=350V, Min Operating Temperature=-40°C, Min Varistor Voltage=387V, Power Rating=400mW, Tolerance=10%, Varistor Voltage=430V, ComponentLink1Description=http://www.farnell.com/datasheets/1680955.pdf?src-supplier=Farnell, ComponentLink1URL=http://www.farnell.com/datasheets/1680955.pdf?src-supplier=Farnell, ComponentLink2Description=http://www.farnell.com/datasheets/2311597.pdf?src-supplier=Farnell, ComponentLink2URL=http://www.farnell.com/datasheets/2311597.pdf?src-supplier=Farnell, ComponentLink3Description=http://components.arrow.com/part/dataview/30869957S9461734N9769?src-supplier=Arrow+Electronics, ComponentLink3URL=http://components.arrow.com/part/dataview/30869957S9461734N9769?src-supplier=Arrow+Electronics, ComponentLink4Description=http://www.farnell.com/datasheets/1680955.pdf?src-supplier=Element14, ComponentLink4URL=http://www.farnell.com/datasheets/1680955.pdf?src-supplier=Element14, ComponentLink5Description=http://www.farnell.com/datasheets/2311597.pdf?src-supplier=Newark, ComponentLink5URL=http://www.farnell.com/datasheets/2311597.pdf?src-supplier=Newark, ComponentLink6Description=http://datasheet.octopart.com/B72210S2271K101-EPCOS-datasheet-11546246.pdf?src-supplier=Distrelec, ComponentLink6URL=http://datasheet.octopart.com/B72210S2271K101-EPCOS-datasheet-11546246.pdf?src-supplier=Distrelec, ComponentLink7Description=https://en.tdk.eu/inf/70/db/var/SIOV_Leaded_AdvanceD.pdf?src-supplier=Digikey, ComponentLink7URL=https://en.tdk.eu/inf/70/db/var/SIOV_Leaded_AdvanceD.pdf?src-supplier=Digikey, ComponentLink8Description=https://datasheet.octopart.com/S10K275E2-EPCOS-datasheet-5104.pdf?src-supplier=Future+Electronics, ComponentLink8URL=https://datasheet.octopart.com/S10K275E2-EPCOS-datasheet-5104.pdf?src-supplier=Future+Electronics, ComponentLink9Description=http://datasheet.octopart.com/B72210S2271K101-EPCOS-datasheet-11546246.pdf?src-supplier=Mouser, ComponentLink9URL=http://datasheet.octopart.com/B72210S2271K101-EPCOS-datasheet-11546246.pdf?src-supplier=Mouser, ComponentLink10Description=https://datasheet.octopart.com/B72210S2271K101-EPCOS-datasheet-11546246.pdf?src-supplier=Newark, ComponentLink10URL=https://datasheet.octopart.com/B72210S2271K101-EPCOS-datasheet-11546246.pdf?src-supplier=Newark, ComponentLink11Description=http://datasheet.octopart.com/B72210S2271K101-EPCOS-datasheet-11546246.pdf?src-supplier=Avnet, ComponentLink11URL=http://datasheet.octopart.com/B72210S2271K101-EPCOS-datasheet-11546246.pdf?src-supplier=Avnet, ComponentLink12Description=http://www.epcos.com/inf/70/db/var_08/SIOV_Leaded_StandarD.pdf?src-supplier=Future+Electronics, ComponentLink12URL=http://www.epcos.com/inf/70/db/var_08/SIOV_Leaded_StandarD.pdf?src-supplier=Future+Electronics, ComponentLink13Description=http://datasheet.octopart.com/B72210S2271K101-EPCOS-datasheet-11546246.pdf?src-supplier=Verical, ComponentLink13URL=http://datasheet.octopart.com/B72210S2271K101-EPCOS-datasheet-11546246.pdf?src-supplier=Verical, ComponentLink14Description=http://datasheet.octopart.com/B72210S2271K101-EPCOS-datasheet-11546246.pdf?src-supplier=TME, ComponentLink14URL=http://datasheet.octopart.com/B72210S2271K101-EPCOS-datasheet-11546246.pdf?src-supplier=TME, ComponentLink15Description=http://datasheet.octopart.com/B72210S2271K101-EPCOS-datasheet-11546246.pdf?src-supplier=TTI, ComponentLink15URL=http://datasheet.octopart.com/B72210S2271K101-EPCOS-datasheet-11546246.pdf?src-supplier=TTI, ComponentLink16Description=http://datasheet.octopart.com/B72210S2271K101-EPCOS-datasheet-11546246.pdf?src-supplier=Rutronik, ComponentLink16URL=http://datasheet.octopart.com/B72210S2271K101-EPCOS-datasheet-11546246.pdf?src-supplier=Rutronik, Contact Plating=154ConductorMaterial, Current Rating=25A, Depth=5.4mm, Diameter=12mm, Energy=55J, ESD Protection=5898YesNo, Height=14.5mm, Item Type=Varistors, Lead Pitch=7.5mm, Lead/Base Style=Radial, Manufacturer Part Number=B72210S2271K101, Material=4240ConductorMaterial, Mounting Technology="Through Hole", Number of Circuits=1, Packaging=Bulk, Pricing="1=0.12365, 10=0.12192, 30=0.12018, 50=0.11845, 100=0.11671 (USD)", Radiation Hardening=5898YesNo, Reach SVHC Compliant=Unknown, RoHS=Yes, RoHS Compliant=Yes, Series=AdvanceD, Stock=5700, Supplier=Avnet, Termination=4745ConnectorType, Voltage Rating=350V, Voltage Rating (AC)=275V, Voltage Rating (DC)=350V, Voltage Tolerance=10%, Weight=2.000002g

## Free pads (board coordinates)
  round 196.85 hole 122.05: MH1(109.33,5056.57) MH1(109.33,109.43) MH1(6188.67,5056.57) MH1(6188.67,109.43)

## Via types
v1: diameter 23.62, hole 11.81, Top Layer to Bottom Layer, 30 vias

## Nets (pads, with @x,y where several pads share a name; then routed paths per layer and width w, separated by ;. In a path a pad name is that pad's centre, name@x,y a point inside that pad or via, vN(x,y) a via of type N, cw(c..) or ccw(c..) an arc to the next point about the centre after c; other vN are vias at no path point)
12V: C60.2 C61.2 D10.2 R59.2 R65.1 U9.12
24V: C47.1 J2.1 L4.2 R57.1 R61.2
+5V: C32.2 C67.2 R71.1 R74.2 U6.5 U13.6 U14.5
+390V: C1.2 C12.2 C39.2 D1.1 D5.1 Q7.2 R15.2 R36.2 R55.2
AUX_15V: C13.2 C15.2 C18.2 C19.2 C54.2 R16.2 R51.2 U1.1 U2.1 U3.5 U4.12 U8.1
BLK: C66.2 R63.1 R67.2 U9.4
BW: C65.2 R46.1 R49.2 U9.8
COMP: C23.2 R27.2 U4.5
DRV: R5.1 R79.2 U3.1
EARTH: C6.1 C7.1 C10.2 C11.2 J3.1 pad.MH1@109.33,109.43 pad.MH1@6188.67,109.43
  other v1: 114.33,32.27 6183.67,32.27 58.42,51.29 6239.58,51.29 167.31,58.36 6130.69,58.36 32.33,104.27 6265.67,104.27 186.3,118.67 6111.7,118.67 51.35,160.18 6246.65,160.18 164.24,170.25 6133.76,170.25 104.33,186.27 6193.67,186.27
G1: R50.1 U5.1
G2: R39.2 U7.1
GD1: R8.1 U4.14
GD2: R12.1 U4.11
HO: D8.1 Q8.1 U9.15
I_OUT: R73.1 U13.1
ISNS: C50.1 C53.2 R48.2 U9.6
LDO_IN: C55.2 C57.1 C58.2 D11.2 U8.8 U9.3
LIVE: F1.1 J1.2
LL/SS: C64.2 R59.1 R64.2 U9.9 U12.4
LO: D9.1 Q11.1 U9.10
NET_A: D3.2 D4.2 R19.1 R52.1
NetBR1_1: BR1.1 C3.2 L1.1
NetBR1_2: BR1.2 D4.1 L3.4
NetBR1_3: BR1.3 D3.1 L3.3
NetC2_2: Q2.2 R78.2
NetC6_2: C6.2 F1.2 L2.1 VR1.2
NetC7_2: C7.2 L2.4 L3.1
NetC9_1: C10.1 L2.3 L3.2
NetC14_2: C14.2 R8.2 U1.3
NetC16_2: C16.2 R12.2 U2.3
NetC17_2: C17.2 R14.1 U4.16
NetC20_2: C20.2 R20.2 R24.2 R79.1 U3.3
NetC21_2: C21.2 R22.1 U4.1
NetC22_2: C22.2 R23.1 R26.2 U4.2
NetC24_2: C24.2 R28.1 U4.10
NetC25_2: C25.2 R29.1 R30.1 U4.9
NetC26_2: C26.2 R21.1 R32.2 U4.7
NetC27_2: C27.2 R31.2 R33.2 U4.4
NetC28_2: C28.2 R30.2 R31.1 U4.15
NetC29_2: C29.2 R34.1 R37.2 U4.8
NetC31_2: C31.2 U5.3
NetC35_2: C35.2 U7.3
NetC36_2: C36.2 R27.1
NetC37_1: C37.1 R40.2
NetC39_1: C39.1 C49.2 C50.2 C51.2
NetC48_1: C48.1 R44.2
NetC56_2: C56.2 D10.1 U9.14
NetC59_1: C59.1 C63.2 R60.1 U10.2 U11.1
NetC59_2: C59.2 R62.2
NetC62_2: C62.2 U9.5 U10.4
NetC63_1: C63.1 R61.1 R62.1 R69.2 U11.2
NetD1_2: D1.2 Q1.3
NetD2_1: D2.1 R1.1 R9.2
NetD2_2: D2.2 Q1.1 R1.2 R4.2
NetD5_2: D5.2 Q3.3
NetD6_1: D6.1 R7.2 R10.1
NetD6_2: D6.2 Q3.1 R10.2 R11.2
NetD7_1: D7.1 R16.1 U3.4
NetD8_2: D8.2 R41.1
NetD9_2: D9.2 R45.1
NetQ2_1: Q2.1 R5.2 R6.2
NetQ4_1: Q4.1 Q5.1 R38.1
NetQ6_4: Q6.4 R39.1
NetQ7_1: Q7.1 Q8.2 R41.2 R42.2
NetQ7_3: Q7.3 Q8.3 Q9.2 R42.1
NetQ9_1: Q9.1 Q11.2 R45.2 R47.2
NetQ10_4: Q10.4 R50.2
NetQ12_1: Q12.1 R65.2 R68.2
NetQ12_3: Q12.3 U8.3
NetR7_1: R7.1 U1.5
NetR9_1: R9.1 U2.5
NetR13_2: R13.2 R17.1
NetR15_1: R15.1 R18.2
NetR17_2: R17.2 R21.2
NetR18_1: R18.1 R23.2
NetR19_2: R19.2 R20.1
NetR25_2: R25.2 U4.3
NetR34_2: R34.2 R35.1
NetR35_2: R35.2 R36.1
NetR51_1: R51.1 R56.2 U8.7
NetR52_2: R52.2 R53.1
NetR53_2: R53.2 R54.1
NetR54_2: R54.2 U9.1
NetR55_1: R55.1 R58.2
NetR57_2: R57.2 R60.2 U10.1
NetR58_1: R58.1 R63.2
NetR66_2: R66.2 U10.3
NetR70_1: R70.1 R74.1 R77.2 U14.3
NetR70_2: R70.2 R72.1 U12.2 U14.4
NetR71_2: R71.2 R72.2 U12.1
NetR73_2: R73.2 U14.1
NetR75_2: R75.2 U13.3
NetR76_2: R76.2 U13.4
NetT3_2: 
NEUTRAL: C11.1 J1.1 L2.2 VR1.1
PGND: C1.1 C12.1 C13.1 C14.1 C15.1 C16.1 C17.1 C18.1 C19.1 C20.1 C21.1 C22.1 C23.1 C24.1 C25.1 C26.1 C27.1 C28.1 C29.1 C36.1 C38.2 C51.1 C52.1 C53.1 C54.1 C55.1 C57.2 C58.1 C60.1 C61.1 C62.1 C64.1 C65.1 C66.1 D7.2 Q1.2 Q2.3 Q3.2 Q9.3 Q11.3 Q12.2 R2.1 R3.1 R4.1 R6.1 R11.1 R24.1 R25.1 R26.1 R29.2 R32.1 R33.1 R37.1 R47.1 R48.1 R49.1 R56.1 R64.1 R66.1 R67.1 R68.1 R78.1 U1.2 U1.4 U2.2 U2.4 U3.2 U4.6 U4.13 U8.4 U9.11 U12.3 | length 305.6
  Top Layer w20: U4.6@8095.7,4376 8157,4376 8158,4377 8158,4458 8176,4476 U4.13@8308.3,4476 8311,4476 U4.13@8312,4477
R_SENSE: J2.2 R43.2 R75.1
SGND: C30.1 C31.1 C32.1 C33.1 C34.1 C35.1 C37.2 C40.1 C41.1 C42.1 C43.1 C44.2 C45.2 C46.2 C47.2 C48.2 C67.1 Q5.2 Q6.1 Q6.2 Q6.3 Q10.1 Q10.2 Q10.3 R43.1 R69.1 R76.1 R77.1 U5.2 U6.2 U7.2 U11.3 U13.2 U13.5 U14.2
SW: C56.1 U9.16
V24V: C38.1 C40.2 C41.2 C42.2 C43.2 C44.1 C45.1 C46.1 L4.1 Q4.3 R38.2
VAC: C4.2 C5.2 L1.2 R13.1
VCR: C49.1 C52.2 U9.7
VD1: Q10.5 Q10.6 Q10.7 Q10.8 R44.1 U5.5
VD2: Q6.5 Q6.6 Q6.7 Q6.8 R40.1 U7.5
VDD: C30.2 C33.2 C34.2 Q4.2 U5.4 U6.1 U6.3 U7.4
VN: BR1.4 C3.1 C4.1 C5.1 R2.2 R3.2 R28.2
X: D11.1 R46.2
ZCD1: R22.2
ZCD2: R14.2
pads on no net: U6.4 U8.2 U8.5 U8.6
copper on no net:
  other v1: 104.33,4979.73 164.24,4995.75 51.34,5005.82 6246.65,5005.82 186.3,5047.33 6111.7,5047.33 32.33,5061.73 6265.67,5061.73 167.31,5107.64 6130.69,5107.64 58.42,5114.71 6239.58,5114.71 114.33,5133.73 6183.67,5133.73

## Other copper
Top Layer:
  rectangle net PGND: 8113,4768 8283,4821
  rectangle net PGND: 8147,4243 8197,4922
  region: 2.15,5113.9 2.15,4983.72 ccw(c7.16,4983.72) 4.91,4979.24 ccw(c9.3,4981.44) 5.37,4978.49 ccw(c111.16,5057.56) 243.24,5057.57 ccw(c111.16,5057.57) 191.08,5162.72 ccw(c188.05,5158.74) 188.05,5163.74 2.15,5163.74
  region net EARTH: 6295.85,52.1 6295.85,182.28 ccw(c6290.84,182.28) 6293.09,186.76 ccw(c6288.7,184.56) 6292.63,187.51 ccw(c6186.84,108.44) 6054.76,108.43 ccw(c6186.84,108.43) 6106.92,3.28 ccw(c6109.95,7.26) 6109.95,2.26 6295.85,2.26
  region: 6295.85,5113.9 6295.85,4983.72 cw(c6290.84,4983.72) 6293.09,4979.24 cw(c6288.7,4981.44) 6292.63,4978.49 cw(c6186.83,5057.56) 6054.76,5057.57 cw(c6186.84,5057.57) 6106.92,5162.72 cw(c6109.95,5158.74) 6109.95,5163.74 6295.85,5163.74
  region net EARTH: 2.15,52.1 2.15,182.28 cw(c7.16,182.28) 4.91,186.76 cw(c9.3,184.56) 5.37,187.51 cw(c111.16,108.44) 243.24,108.43 cw(c111.16,108.43) 191.08,3.28 cw(c188.05,7.26) 188.05,2.26 2.15,2.26
Bottom Layer:
  region net EARTH: 6295.85,52.1 6295.85,182.28 ccw(c6290.84,182.28) 6293.09,186.76 ccw(c6288.7,184.56) 6292.63,187.51 ccw(c6186.84,108.44) 6054.76,108.43 ccw(c6186.84,108.43) 6106.92,3.28 ccw(c6109.95,7.26) 6109.95,2.26 6295.85,2.26
  region: 2.15,5113.9 2.15,4983.72 ccw(c7.16,4983.72) 4.91,4979.24 ccw(c9.3,4981.44) 5.37,4978.49 ccw(c111.16,5057.56) 243.24,5057.57 ccw(c111.16,5057.57) 191.08,5162.72 ccw(c188.05,5158.74) 188.05,5163.74 2.15,5163.74
  region: 6295.85,5113.9 6295.85,4983.72 cw(c6290.84,4983.72) 6293.09,4979.24 cw(c6288.7,4981.44) 6292.63,4978.49 cw(c6186.83,5057.56) 6054.76,5057.57 cw(c6186.84,5057.57) 6106.92,5162.72 cw(c6109.95,5158.74) 6109.95,5163.74 6295.85,5163.74
  region net EARTH: 2.15,52.1 2.15,182.28 cw(c7.16,182.28) 4.91,186.76 cw(c9.3,184.56) 5.37,187.51 cw(c111.16,108.44) 243.24,108.43 cw(c111.16,108.43) 191.08,3.28 cw(c188.05,7.26) 188.05,2.26 2.15,2.26

## Silkscreen, mask and mechanical layers (free items; w line width, h text height)
Top Overlay:
  text "EXTERNAL STEPPER DRIVER - 4" at 6441.5,2277.57 h75
  text "STEPPER DRIVER - 1" at 6550,2124.06 h68
  text "24V INPUT" at 6516,2024.4 h75
Bottom Overlay:
  drawing of 16 lines, arcs and shapes, not listed
  text "STEPPER BOARD - v1.0" at 7478.33,1784.61 h100
  text "ZERO CARBON FOOTPRINT" at 7278,1218 h40
Board Outline:
  lines w20: 0,5163.74 0,0 6298,0 6298,5166 0,5166

## Dimensions
0,5166 to 0,0 on Dimension

## Text inside footprints (layer, text, board x,y; h text height)
BR1: Top Overlay "-" at 14324.14,4330.85 h52.3 r90; Top Overlay "+" at 14312.71,4946.85 h52.3 r90
L2: Top Overlay "1" at 12186.87,4914.98 h39.37 r270
L3: Top Overlay "1" at 13477.87,4914.98 h39.37 r270